# Altium PCB zulu_a7_fab_b.PcbDoc (part 2 of 5)
Units mm, origin at the board's own origin, x right, y up, seen from the top; angles counter-clockwise.
Board outline 69.85 x 25.4 mm, 6 copper layers (Top Layer, L2-GND, L3-SIG, L4-SIG, L5-VCC3V3, Bottom Layer), stack 1.65 mm thick; 203 components, 197 nets, 896 pads, 2025 vias.
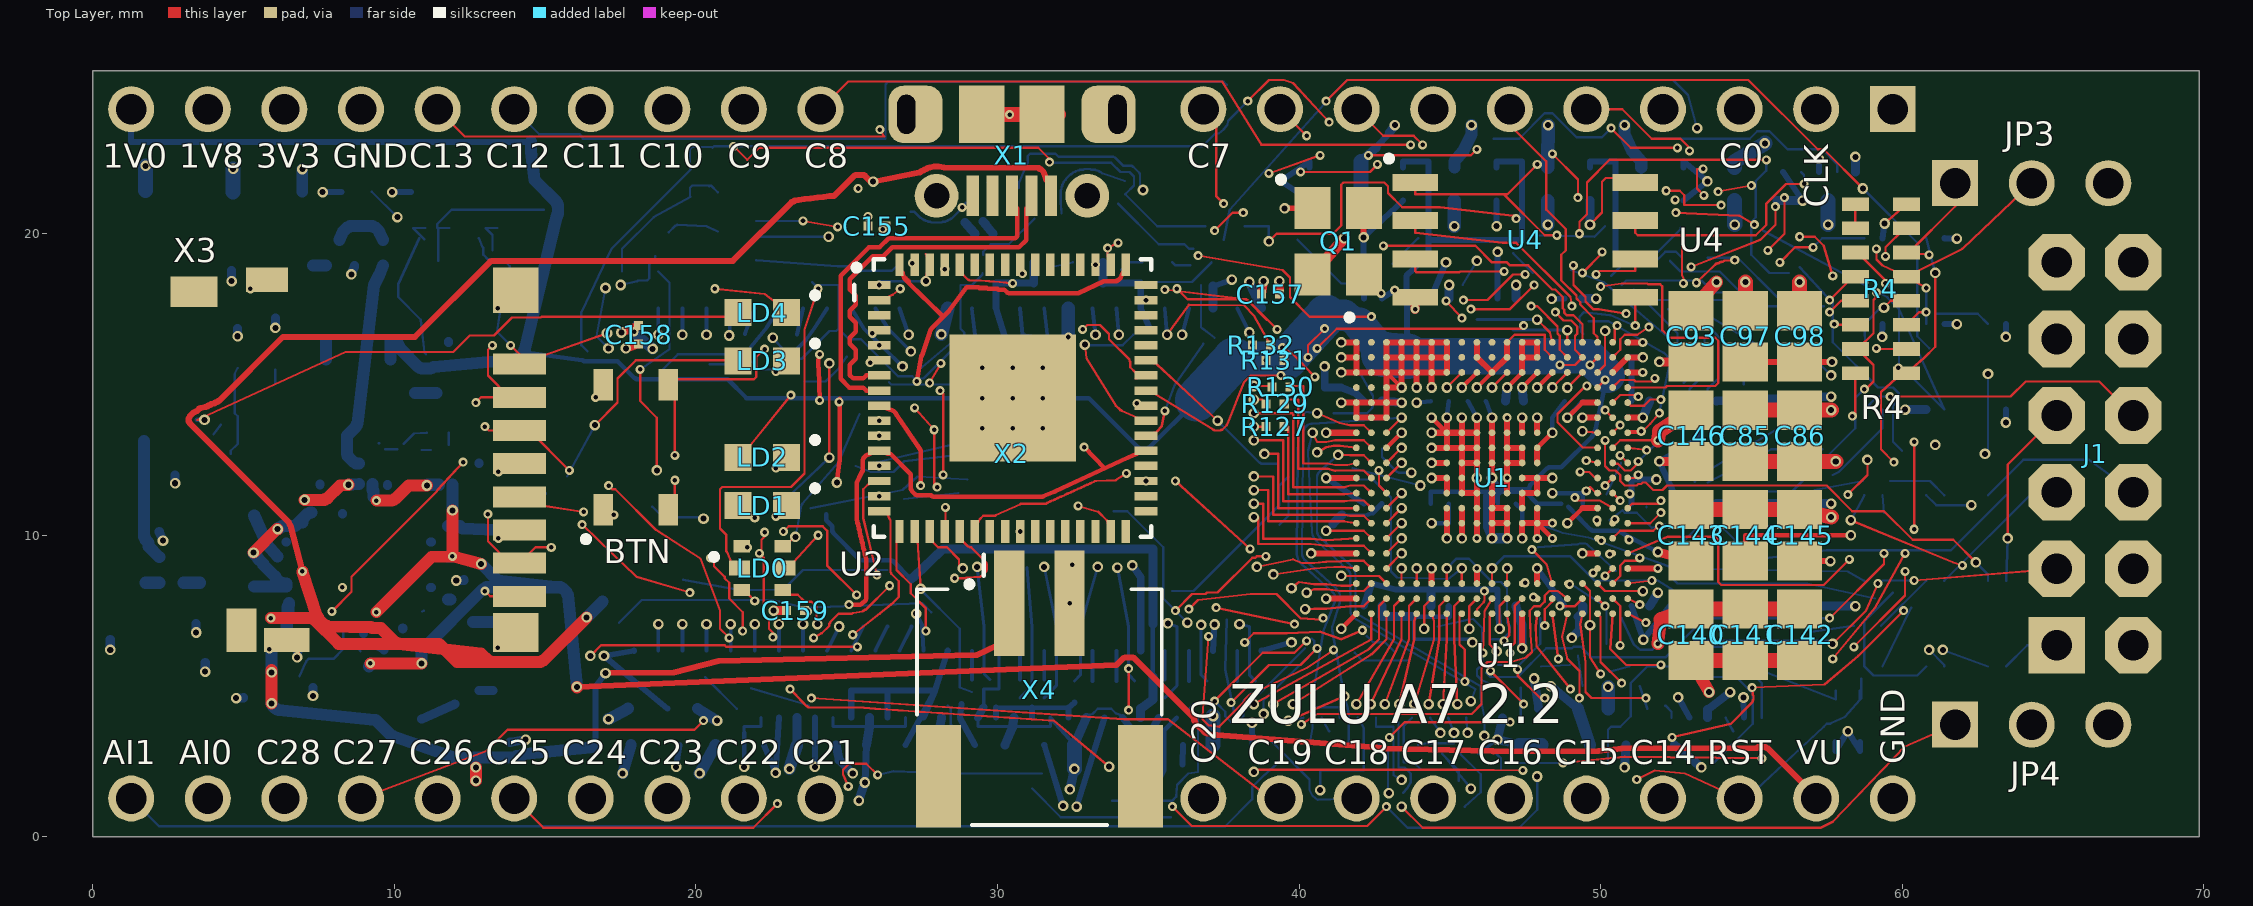
[diagram p0: Top Layer view]

## Part data (continued)
R1: library part RES2742, "Resistor 2-pack   Package of two resistors.", DeviceName=742, DeviceSetName=RES2, GateName_1=A, GateName_2=B, LibraryName=ctambe, MANF=CTS, MANF#=742C043472JP, NOTE="The two configuration pull-ups in one package: A on INIT_B (net FPGA-INIT#), B on PROGRAM_B (net RST#). Both commons are pads 3 and 4, side by side on one long side of the body, and both go to VCC3V3. CTS publishes ONE recommended land pattern for the whole 742 package family, so this footprint is the 742C083 pad cell already validated for R34 with two pads per side instead of four. 5 percent: the 742C043 has no 1 percent option either, and a configuration pull-up does not care; 63 mW per element against the 2.3 mW that 3.3 V across 4.7 k actually dissipates. Alternate on the identical land: Panasonic EXB-V4V472JV, same 1.60 x 1.60 mm concave body on 0.80 mm pitch. Do NOT substitute EXB-34V472JV -- same size, convex terminals, different land. R99, the third 4.7 k pull-up on this sheet, stays discrete: it sits on PROG#, the far side of the 100 ohm now in R4. TOLERANCE AGAINST UG470: Table 2-4 asks for a pull-up of 4.7 kohm OR LESS on both of these pins, and this is a 5 percent part, so its worst case is 4.935 k -- 5 percent outside the stated maximum. That is a wording problem rather than a physical one. The limit exists to hold the pin high against input leakage, and DS181 worst-case leakage of 15 uA across 4.935 k is 74 mV, against a VIH of 2.0 V. The discretes this replaces were 1 percent parts and were already outside the same limit, at 4.747 k. Strict compliance would mean 4.3 kohm +-5 percent (4.515 k worst case), but CTS does not stock a 432 code in the 742C043 family -- the stocked spread is 101, 220, 470, 471, 472, 473, 102, 103 and 104 -- so buying compliance here would cost availability, which is the thing that actually stops a board getting built. Dropping to the next stocked value, 1 k, would cost margin where it matters: it lifts the low level the bridge can assert on RST# through the 100 ohm from 0.10 V to 0.43 V.", SPEC="2 x 4.7K +-5% isolated array, 0606 concave 1.60 x 1.60 mm, 0.80 mm pitch, 63 mW per element", SymbolName_1=R1NV0, SymbolName_2=R1NV0
R2 R6 R7: library part R-WIDER0201, "RESISTOR, one element on the 0.4 in symbol   Same R1NV0 symbol the RES4 and RES8 arrays drew their elements with, so a part split out of an array keeps the exact symbol, pin span and position it had on the sheet and not one wire has to move. The 0.2 in R-US_SMALL symbol would have shifted both pins by 2.54 mm and stranded every net that touched them.", DeviceName=R0201, DeviceSetName=R-WIDE, GateName_1=G$1, LibraryName=rcl, MANF=Yageo, MANF#=RC0201FR-074K7L, SPEC="thick film +-1%, 1/20W, 0201", SymbolName_1=R1NV0
R4: library part RES8742, "Resistor 8-pack   Package of eight resistors, six used.", DeviceName=742, DeviceSetName=RES8, GateName_1=A, GateName_2=B, GateName_3=C, GateName_4=D, GateName_5=E, GateName_6=F, GateName_7=G, GateName_8=H, LibraryName=ctambe, MANF=CTS, MANF#=742C163101JP, NOTE="The six 100 ohm series resistors between the FT2232H and the FPGA in one package: A PROG#, B DONE, C TDI, D TDO, E TMS, F TCK, in the order they are drawn down the sheet. Pads 1-6 face the bridge and pads 16-11 face the FPGA, one long side of the body per end of the link. TWO ELEMENTS ARE SPARE (pads 7-10); they sit at the far end of the body, so the six used run contiguously from pad 1. Leave the spare pads unconnected. There is no purchasable 6-element part: CTS 753123101GP is a genuine 12-terminal, 6-isolated-element, 100 ohm array, but Digi-Key holds none, quotes 28 weeks at MOQ 1000 and $2.63 each, and its 12-SRT body is 8.76 x 2.03 mm, LARGER than this 8-element chip array. Same CTS 74x concave family as R34, so all three arrays on the board answer to one CTS land-pattern rule (0.45 x 0.80 mm pads, 0.80 mm pitch, 2.60 mm across). 5 percent like R34: the 742C163 has no 1 percent option, which series damping does not care about, and 63 mW per element is twenty times the worst case. Alternate if the layout needs the length back: Panasonic EXB-2HV101JV is the same 8 x 100 ohm isolated in 3.80 x 1.60 mm, but convex terminals on 0.50 mm pitch, so it needs its own land pattern. AT LAYOUT: all six lines now converge on one part -- put it between the bridge and the FPGA where the four JTAG lines already run together, and keep TCK, element F on pads 6/11, at the end of the body: its only live neighbour is TMS. SUPPLY CAVEATS, all read 2026-09-09. (1) CTS files the whole 74x series -- this part and R34's 742C083 with it -- under Legacy Products on its own site. Near-term risk is low: 25,352 stocked, MOQ 1, deep sibling stock. It is not a young family. (2) There is no drop-in second source on this land. The alternate above needs its own footprint, so this one package is a single point of failure where the six discretes it replaces had many interchangeable vendors; if that matters for the build, qualify a second 16-pad 0.80 mm concave array on the same land first. (3) Every stock and price figure here is Digi-Key alone -- Mouser, Arrow, TTI, Octopart and LCSC all refused automated reads that day -- so none of it has second-distributor corroboration. AND ONE LAYOUT POINT: the two spare elements are unplaced, so pads 7-10 carry no net. If the layout wants them as grounded metal beside TCK, that has to come back here as two more placed gates with both ends on GND; it cannot be done in the PCB alone.", SPEC="8 x 100 ohm +-5% isolated array, 2506 concave 6.40 x 1.60 mm, 0.80 mm pitch, 63 mW per element; six elements used, two spare", SymbolName_1=R1NV0, SymbolName_2=R1NV0, SymbolName_3=R1NV0, SymbolName_4=R1NV0, SymbolName_5=R1NV0, SymbolName_6=R1NV0, SymbolName_7=R1NV0, SymbolName_8=R1NV0
R5 R10 R11 R12 R13 R14 R15 R16 R17: library part R-US_R0201, "RESISTOR, American symbol", DeviceName=R0201, DeviceSetName=R-US_, GateName_1=G$1, LibraryName=rcl, MANF=Yageo, SPEC="thick film +-1%, 1/20W, 0201", SymbolName_1=R-US
  R5: MANF#=RC0201FR-075K1L, MOUSER#=301-5.1K-RC
  R10 R14: MANF#=RC0201FR-072K32L
  R11 R15: MANF#=RC0201FR-071KL
  R12 R16: MANF#=RC0201FR-07140RL
  R13 R17: MANF#=RC0201FR-07845RL
R18 R21 R80 R81 R82 R83 R84 R85 R86 R102 R103 R107 R108: library part R-US_SMALLR0402, "RESISTOR, American symbol, small 2-zigzag variant (sheet 2 only)", DeviceName=R0402, DeviceSetName=R-US_SMALL, GateName_1=G$1, LibraryName=rcl, MANF=Yageo, SymbolName_1=R-US_SMALL
  R18: MANF#=RC0402FR-0712KL, NOTE="Stays 0402 deliberately. Power is trivial (0.9 mW) and 1 percent is 1 percent at any size, but this is the FT2232's RREF -- it sets the USB transceiver bias current. There is no space pressure on this board any more, so there is nothing to gain against a part whose drift shows up as USB signal quality.", SPEC="thick film +-1%, 1/16W, 0402"
  R21: MANF#=RC0402FR-071KL, SPEC="thick film +-1%, 1/16W, 0402"
  R80 R82: MANF#=RC0402FR-0733RL, NOTE="RGB LED balance. The green and blue dice are 3.3 V-class parts on a 3.3 V rail, so the resistor never dominates their current -- that is structural and no resistor value fixes it. What the values CAN do is stop red swamping the other two. As built, and as Cmod A7 ships the same LED, 182/182/100 gave red 6.9 mA against green 1.9 and blue 1.5: red about four times either. At 330/33/33 it is red 3.8, green 2.9, blue 2.9. Worst case improves too, not just nominal -- green with a part 0.15 V high in Vf goes from 1.4 mA to 1.8. Lower resistors do make the current MORE sensitive in percentage terms, 77 percent of nominal retained at 100R against 61 at 33R, but the absolute floor is what you see and it rises. Currents read off the datasheet's own Vf/If curve at the working point, not off the 20 mA table.", SPEC="thick film +-1%, 1/16W, 0402"
  R81: MANF#=RC0402FR-07330RL, NOTE="RGB LED balance. The green and blue dice are 3.3 V-class parts on a 3.3 V rail, so the resistor never dominates their current -- that is structural and no resistor value fixes it. What the values CAN do is stop red swamping the other two. As built, and as Cmod A7 ships the same LED, 182/182/100 gave red 6.9 mA against green 1.9 and blue 1.5: red about four times either. At 330/33/33 it is red 3.8, green 2.9, blue 2.9. Worst case improves too, not just nominal -- green with a part 0.15 V high in Vf goes from 1.4 mA to 1.8. Lower resistors do make the current MORE sensitive in percentage terms, 77 percent of nominal retained at 100R against 61 at 33R, but the absolute floor is what you see and it rises. Currents read off the datasheet's own Vf/If curve at the working point, not off the 20 mA table.", SPEC="thick film +-1%, 1/16W, 0402"
  R83 R84: MANF#=RC0402FR-07330RL, SPEC="thick film +-1%, 1/16W, 0402"
  R85 R86: MANF#=RC0402FR-0710KL, SPEC="thick film +-1%, 1/16W, 0402"
  R102: MANF#=RC0402FR-074K12L, SPEC="thick film +-1% 0402 -- LTC3556 PROG: 1022 V / 4.12k = 248 mA charge current"
  R103: MANF#=RC0402FR-07576RL, SPEC="thick film +-1% 0402 -- LTC3556 CLPROG, 500 mA USB limit with I2C off (1x mode, hCLPROG 224): 1.188 V x 225 / 576 = 464 mA + 0.4 mA typ, ~425-489 mA over the datasheet spread; CLPROG pin 2.1 mA < 3 mA abs max"
  R107: MANF#=RC0402FR-07680RL, SPEC="thick film +-1% 0402 -- PGOODALL pull-up and LD3 current: (3.3 - 2.0) / 680 = 1.9 mA"
  R108: MANF#=RC0402FR-071KL, SPEC="thick film +-1% 0402 -- LD4 (CHRG) current: (3.7 - 2.0) / 1.0k = 1.7 mA"
R19 R20 R22 R23 R24 R25 R26 R27 R28 R29 R30 R31 R32 R33 R90 R91 R92 R93 R94 R96 R97 R98 R99 R101 R113 R114 R115 R116 R117 R118: library part R-US_SMALLR0201, "RESISTOR, American symbol, small 2-zigzag variant (sheet 2 only)", DeviceName=R0201, DeviceSetName=R-US_SMALL, GateName_1=G$1, LibraryName=rcl, MANF=Yageo, SymbolName_1=R-US_SMALL
  R19 R90 R91 R92 R93 R94 R96 R97 R98: MANF#=RC0201FR-0710KL, SPEC="thick film +-1%, 1/20W, 0201"
  R20 R22 R23: MANF#=RC0201FR-071KL, SPEC="thick film +-1%, 1/20W, 0201"
  R24 R25: MANF#=RC0201FR-0733RL, SPEC="thick film +-1%, 1/20W, 0201"
  R26 R27 R28 R29 R30 R31 R32 R33: MANF#=RC0201FR-07200RL, SPEC="thick film +-1%, 1/20W, 0201"
  R99: MANF#=RC0201FR-074K7L, SPEC="thick film +-1%, 1/20W, 0201"
  R101: MANF#=RC0201FR-072K21L, SPEC="thick film +-1%, 1/20W, 0201"
  R113: MANF#=RC0201FR-07150KL, SPEC="thick film +-1% 0201 -- Buck2 divider top: 0.8 V x (1 + 150k/120k) = 1.800 V"
  R114: MANF#=RC0201FR-07120KL, SPEC="thick film +-1% 0201 -- Buck2 divider bottom"
  R115: MANF#=RC0201FR-07324KL, SPEC="thick film +-1% 0201 -- buck-boost divider top / Type III R1 (sets the compensation; keep): 0.8 V x (1 + 324k/104k) = 3.29 V"
  R116: MANF#=RC0201FR-07102KL, SPEC="thick film +-1% 0201 -- buck-boost divider bottom (RFB, DC only): VCC3V3 = 0.8 V x (1 + 324k/102k) = 3.34 V (2026-11-11: 104k 0.1% ERA-1AEB1043C does not exist; ERA-1AEB 0201 stops at 10k)"
  R117: MANF#=RC0201FR-0715KL, SPEC="thick film +-1% 0201 -- Type III R2 (with C165, VC3 to FB3)"
  R118: MANF#=RC0201FR-07121KL, SPEC="thick film +-1% 0201 -- Type III R3 (with C166 across R115)"
R34: library part RES4742, "Resistor 4-pack   Package of four resistors.", DeviceName=742, DeviceSetName=RES4, DIGIKEY#=742C083???JPCT-ND, GateName_1=A, GateName_2=B, GateName_3=C, GateName_4=D, LibraryName=ctambe, MANF=CTS, MANF#=742C083472JP, MOUSER#=774-742C083???JP, NOTE="The microSD DAT0-3 pull-ups, all four elements used -- which is what an array is actually for. R1, R2 and R4 used 2, 3 and 6 of theirs in the EAGLE original and were split into discretes during the import; on 2026-09-09 R1 and R4 went back into arrays of their own (742C043472JP and 742C163101JP), so all three arrays on this board are CTS 74x concave parts sharing one land-pattern rule. R2 is still a discrete. 4.7k is the conventional value for SD data lines and it was already chosen; only the part number was missing. 5 percent is ample for a pull-up, so this is a J part where the discrete resistors on this board are F. CTS 742C is the family the footprint is named after. Confirm the suffix -- it encodes tolerance and packaging and is the easy thing to get wrong.", SPEC="4x4.7K isolated array 0603x4, 0.8 mm pitch; direct successor of the obsolete JTR", SymbolName_1=R1NV0, SymbolName_2=R1NV0, SymbolName_3=R1NV0, SymbolName_4=R1NV0
R35: library part R-US_R0402, "RESISTOR, American symbol", DeviceName=R0402, DeviceSetName=R-US_, GateName_1=G$1, LibraryName=rcl, MANF=Yageo, MANF#=RC0402FR-074K7L, SPEC="thick film +-1%, 1/16W, 0402", SymbolName_1=R-US
R119 R120 R121 R122 R123 R124 R125 R126 R127 R128 R129 R130 R131 R132 R133 R134: library part R-US_SMALLR0201, "RESISTOR, American symbol, small 2-zigzag variant", DeviceName=R0201, DeviceSetName=R-US_SMALL, GateName_1=G$1, LibraryName=rcl, MANF=Yageo, MANF#=RC0201FR-0722RL, NOTE="series R on the SDRAM data net; position is SI-critical, see Zulu_A7_no_pmod/Rev_2/docs/dq_series_resistors.md", SPEC="thick film +-1%, 1/20W, 0201", SymbolName_1=R-US_SMALL
U1: library part XC7A35T-CPG236-1CPG236C, "Xilinx Artix-7 XC7A35T-2CPG236I   Replacement for the Spartan-6 XC6SLX25-FT256. See design notes: SDRAM/microSD/GPIO ball assignments verified against Digilent Cmod A7-35T (same device+package); config/JTAG/power ball assignments are functionally correct placeholders pending verification against the official Xilinx pinout file.", POWER=POWER, BANK216="BANK 216", DeviceName=-2CPG236I, DeviceSetName=XC7A35T-CPG236, GATE=A0, GateName_1=PWR, GateName_2=GND, GateName_3=BANK216, GateName_4=PART_VALUE, GateName_5=SDRAM_A0, GateName_6=SDRAM_A1, GateName_7=SDRAM_A2, GateName_8=SDRAM_A3, GateName_9=SDRAM_A4, GateName_10=SDRAM_A5, GateName_11=SDRAM_A6, GateName_12=SDRAM_A7, GateName_13=SDRAM_A8, GateName_14=SDRAM_A9, GateName_15=SDRAM_A10, GateName_16=SDRAM_A11, GateName_17=SDRAM_A12, GateName_18=SDRAM_BA0, GateName_19=SDRAM_BA1, GateName_20=SDRAM_CAS#, GateName_21=SDRAM_RAS#, GateName_22=SDRAM_WE#, GateName_23=SDRAM_CS#, GateName_24=SDRAM_CKE, GateName_25=SDRAM_CLK, GateName_26=SDRAM_LDQM, GateName_27=SDRAM_UDQM, GateName_28=SDRAM_DQ0, GateName_29=SDRAM_DQ1, GateName_30=SDRAM_DQ2, GateName_31=SDRAM_DQ3, GateName_32=SDRAM_DQ4, GateName_33=SDRAM_DQ5, GateName_34=SDRAM_DQ6, GateName_35=SDRAM_DQ7, GateName_36=SDRAM_DQ8, GateName_37=SDRAM_DQ9, GateName_38=SDRAM_DQ10, GateName_39=SDRAM_DQ11, GateName_40=SDRAM_DQ12, GateName_41=SDRAM_DQ13, GateName_42=SDRAM_DQ14, GateName_43=SDRAM_DQ15, GateName_44=SPI_SPI_CCLK, GateName_45=SPI_D00_MOSI, GateName_46=SPI_D01_DIN, GateName_47=SPI_FCS_B, GateName_48=SD_DAT3, GateName_49=SD_DAT2, GateName_50=SD_DAT1, GateName_51=CHAN0, GateName_52=CHAN1, GateName_53=CHAN2, GateName_54=CHAN3, GateName_55=CHAN4, GateName_56=CHAN5, GateName_57=CHAN6, GateName_58=CHAN7, GateName_59=CHAN8, GateName_60=CHAN9, GateName_61=CHAN10, GateName_62=CHAN11, GateName_63=IO_W7, GateName_64=CHAN12, GateName_65=CHAN13, GateName_66=CHAN14, GateName_67=CHAN15, GateName_68=CHAN16, GateName_69=CHAN17, GateName_70=CHAN18, GateName_71=CHAN19, GateName_72=CHAN20, GateName_73=CHAN21, GateName_74=CHAN22, GateName_75=CHAN23, GateName_76=CHAN24, GateName_77=CHAN25, GateName_78=CHAN26, GateName_79=CHAN27, GateName_80=UART_CTS, GateName_81=CHAN-CLK, GateName_82=XADC_P, GateName_83=USB_PWREN, GateName_84=XADC_N, GateName_85=CLK12M, GateName_86=UART_TXD, GateName_87=UART_RXD, GateName_88=PROGRAM_B, GateName_89=INIT_B, GateName_90=DONE, GateName_91=TCK, GateName_92=TMS, GateName_93=TDI, GateName_94=TDO, GateName_95=M0, GateName_96=M1, GateName_97=M2, GateName_98=CFGBVS, GateName_99=PUDC_B, GateName_100=MGTPRXP0, GateName_101=MGTPRXN0, GateName_102=MGTPRXP1, GateName_103=MGTPRXN1, GateName_104=GNDADC, GateName_105=VCCADC, GateName_106=VP, GateName_107=VN, GateName_108=VREFP, GateName_109=VREFN, GateName_110=DXP, GateName_111=DXN, GateName_112=MGTPTXP0, GateName_113=MGTPTXN0, GateName_114=MGTPTXP1, GateName_115=MGTREFCLK0P, GateName_116=MGTREFCLK0N, GateName_117=MGTREFCLK1P, GateName_118=MGTREFCLK1N, GateName_119=MGTPTXN1, GateName_120=CHAN28, GateName_121=LED2, GateName_122=LED0_R, GateName_123=IO_A14, GateName_124=IO_A15, GateName_125=IO_A16, GateName_126=LED1, GateName_127=BTN, GateName_128=SD_DAT0, GateName_129=LED0_G, GateName_130=IO_W19, GateName_131=LED0_B, GateName_132=IO_C15, GateName_133=IO_B15, GateName_134=SD_CLK, GateName_135=UART_RTS, GateName_136=IO_N2, GateName_137=SD_CMD, GateName_138=UART_DTR, GateName_139=SPI_D03, GateName_140=SPI_D02, GateName_141=XADC1_P, GateName_142=XADC1_N, GND=GND, LibraryName=ctambe, MANF=AMD/Xilinx, MANF#=XC7A35T-2CPG236I, PART=U1, SymbolName_1=A7_PWR, SymbolName_2=A7_GND, SymbolName_3=A7_BANK216, SymbolName_4=PV_GATE, SymbolName_5=PIN_GATE_IO, SymbolName_6=PIN_GATE_IO, SymbolName_7=PIN_GATE_IO, SymbolName_8=PIN_GATE_IO, SymbolName_9=PIN_GATE_IO, SymbolName_10=PIN_GATE_IO, SymbolName_11=PIN_GATE_IO, SymbolName_12=PIN_GATE_IO, SymbolName_13=PIN_GATE_IO, SymbolName_14=PIN_GATE_IO, SymbolName_15=PIN_GATE_IO, SymbolName_16=PIN_GATE_IO, SymbolName_17=PIN_GATE_IO, SymbolName_18=PIN_GATE_IO, SymbolName_19=PIN_GATE_IO, SymbolName_20=PIN_GATE_IO, SymbolName_21=PIN_GATE_IO, SymbolName_22=PIN_GATE_IO, SymbolName_23=PIN_GATE_IO, SymbolName_24=PIN_GATE_IO, SymbolName_25=PIN_GATE_IO, SymbolName_26=PIN_GATE_IO, SymbolName_27=PIN_GATE_IO, SymbolName_28=PIN_GATE_IO, SymbolName_29=PIN_GATE_IO, SymbolName_30=PIN_GATE_IO, SymbolName_31=PIN_GATE_IO, SymbolName_32=PIN_GATE_IO, SymbolName_33=PIN_GATE_IO, SymbolName_34=PIN_GATE_IO, SymbolName_35=PIN_GATE_IO, SymbolName_36=PIN_GATE_IO, SymbolName_37=PIN_GATE_IO, SymbolName_38=PIN_GATE_IO, SymbolName_39=PIN_GATE_IO, SymbolName_40=PIN_GATE_IO, SymbolName_41=PIN_GATE_IO, SymbolName_42=PIN_GATE_IO, SymbolName_43=PIN_GATE_IO, SymbolName_44=PIN_GATE_IO, SymbolName_45=PIN_GATE_IO, SymbolName_46=PIN_GATE_IO, SymbolName_47=PIN_GATE_IO, SymbolName_48=PIN_GATE_IO, SymbolName_49=PIN_GATE_IO, SymbolName_50=PIN_GATE_IO, SymbolName_51=PIN_GATE_IO, SymbolName_52=PIN_GATE_IO, SymbolName_53=PIN_GATE_IO, SymbolName_54=PIN_GATE_IO, SymbolName_55=PIN_GATE_IO, SymbolName_56=PIN_GATE_IO, SymbolName_57=PIN_GATE_IO, SymbolName_58=PIN_GATE_IO, SymbolName_59=PIN_GATE_IO, SymbolName_60=PIN_GATE_IO, SymbolName_61=PIN_GATE_IO, SymbolName_62=PIN_GATE_IO, SymbolName_63=PIN_GATE_IO, SymbolName_64=PIN_GATE_IO, SymbolName_65=PIN_GATE_IO, SymbolName_66=PIN_GATE_IO, SymbolName_67=PIN_GATE_IO, SymbolName_68=PIN_GATE_IO, SymbolName_69=PIN_GATE_IO, SymbolName_70=PIN_GATE_IO, SymbolName_71=PIN_GATE_IO, SymbolName_72=PIN_GATE_IO, SymbolName_73=PIN_GATE_IO, SymbolName_74=PIN_GATE_IO, SymbolName_75=PIN_GATE_IO, SymbolName_76=PIN_GATE_IO, SymbolName_77=PIN_GATE_IO, SymbolName_78=PIN_GATE_IO, SymbolName_79=PIN_GATE_IO, SymbolName_80=PIN_GATE_OUT, SymbolName_81=PIN_GATE_IO, SymbolName_82=PIN_GATE_IN, SymbolName_83=PIN_GATE_IN, SymbolName_84=PIN_GATE_IN, SymbolName_85=PIN_GATE_IN, SymbolName_86=PIN_GATE_IO, SymbolName_87=PIN_GATE_IO, SymbolName_88=PIN_GATE_IN, SymbolName_89=PIN_GATE_IN, SymbolName_90=PIN_GATE_IN, SymbolName_91=PIN_GATE_IN, SymbolName_92=PIN_GATE_IN, SymbolName_93=PIN_GATE_IN, SymbolName_94=PIN_GATE_IN, SymbolName_95=PIN_GATE_IN, SymbolName_96=PIN_GATE_IN, SymbolName_97=PIN_GATE_IN, SymbolName_98=PIN_GATE_IN, SymbolName_99=PIN_GATE_IN, SymbolName_100=PIN_GATE_IN, SymbolName_101=PIN_GATE_IN, SymbolName_102=PIN_GATE_IN, SymbolName_103=PIN_GATE_IN, SymbolName_104=PIN_GATE_IN, SymbolName_105=PIN_GATE_IN, SymbolName_106=PIN_GATE_IN, SymbolName_107=PIN_GATE_IN, SymbolName_108=PIN_GATE_IN, SymbolName_109=PIN_GATE_IN, SymbolName_110=PIN_GATE_IN, SymbolName_111=PIN_GATE_IN, SymbolName_112=PIN_GATE_IN, SymbolName_113=PIN_GATE_IN, SymbolName_114=PIN_GATE_IN, SymbolName_115=PIN_GATE_IN, SymbolName_116=PIN_GATE_IN, SymbolName_117=PIN_GATE_IN, SymbolName_118=PIN_GATE_IN, SymbolName_119=PIN_GATE_IN, SymbolName_120=PIN_GATE_IN, SymbolName_121=PIN_GATE_IN, SymbolName_122=PIN_GATE_IN, SymbolName_123=PIN_GATE_IN, SymbolName_124=PIN_GATE_IN, SymbolName_125=PIN_GATE_IN, SymbolName_126=PIN_GATE_IN, SymbolName_127=PIN_GATE_IN, SymbolName_128=PIN_GATE_IO, SymbolName_129=PIN_GATE_IN, SymbolName_130=PIN_GATE_IN, SymbolName_131=PIN_GATE_IN, SymbolName_132=PIN_GATE_IN, SymbolName_133=PIN_GATE_IN, SymbolName_134=PIN_GATE_IO, SymbolName_135=PIN_GATE_IN, SymbolName_136=PIN_GATE_IN, SymbolName_137=PIN_GATE_IO, SymbolName_138=PIN_GATE_IN, SymbolName_139=PIN_GATE_IO, SymbolName_140=PIN_GATE_IO, SymbolName_141=PIN_GATE_IN, SymbolName_142=PIN_GATE_IN
U2: library part FT2232HQ-QFN64, "FTDI FT2232HQ Dual USB-UART/MPSSE Bridge, QFN-64. Channel A = MPSSE JTAG to the FPGA (ADBUS0-3 = TCK/TDI/TDO/TMS, ADBUS4/5 = PROG#/DONE). Channel B = UART (BDBUS0-4 = TXD/RXD/RTS#/CTS#/DTR#). Pins 1-64 match FT2232HL; EP is grounded.", DeviceName=-QFN64, DeviceSetName=FT2232HQ, FT2232HQ=FT2232HQ, GateName_1=G$1, LibraryName=ctambe, MANF=FTDI, MANF#=FT2232HQ-REEL, NOTE="FT2232HQ-REEL. Use FTDI-authorized distribution because counterfeit FTDI devices exist. Pins 1-64 match FT2232HL. EP is a separate schematic pin tied to GND as required by DS_FT2232H section 8.1. Footprint FT2232HQ-QFN64 uses 0.75 x 0.28 mm perimeter lands and a 4.20 mm exposed-pad land.", SPEC="USB 2.0 Hi-Speed dual-channel UART/FIFO/MPSSE bridge, QFN-64 9 x 9 mm body, 0.5 mm pitch, 4.35 mm package exposed pad on a 4.20 mm PCB land; same die and pin numbering as FT2232HL; channel A MPSSE JTAG + PROG#/DONE, channel B UART; 12 MHz CMOS oscillator into OSCI, internal 1.8 V regulator, 93LC46B EEPROM, REF 12 k", SymbolName_1=FT2232HQ-BOX
U3: library part SDRAM-X16-ALLIANCE-512M, "SDR SDRAM, x16, 54-pin TSOP-II   The 54-pin TSOP-II x16 SDR pinout is identical for 256Mb and 512Mb: both use row A0-A12 with banks BA0/BA1, and pin 40 is NC on both. They differ only in the column address width -- A0-A8 (512 columns) at 256Mb, A0-A9 (1024 columns) at 512Mb -- which is a memory-controller setting, not a wiring change.", DeviceName=-ALLIANCE-512M, DeviceSetName=SDRAM-X16, GATE=VDD@3, GateName_1=PART_VALUE, GateName_2=VDD@3, GateName_3=DQ0, GateName_4=VDDQ@3, GateName_5=DQ1, GateName_6=DQ2, GateName_7=VSSQ@3, GateName_8=DQ3, GateName_9=DQ4, GateName_10=VDDQ@2, GateName_11=DQ5, GateName_12=DQ6, GateName_13=VSSQ@2, GateName_14=DQ7, GateName_15=VDD@2, GateName_16=LDQM, GateName_17=WE#, GateName_18=CAS#, GateName_19=RAS#, GateName_20=CS#, GateName_21=BA0, GateName_22=BA1, GateName_23=A10, GateName_24=A0, GateName_25=A1, GateName_26=A2, GateName_27=A3, GateName_28=VDD@1, GateName_29=VSS@1, GateName_30=A4, GateName_31=A5, GateName_32=A6, GateName_33=A7, GateName_34=A8, GateName_35=A9, GateName_36=A11, GateName_37=A12, GateName_38=CKE, GateName_39=CLK, GateName_40=UDQM, GateName_41=NC, GateName_42=VSS@2, GateName_43=DQ8, GateName_44=VDDQ@1, GateName_45=DQ9, GateName_46=DQ10, GateName_47=VSSQ@4, GateName_48=DQ11, GateName_49=DQ12, GateName_50=VDDQ@4, GateName_51=DQ13, GateName_52=DQ14, GateName_53=VSSQ@1, GateName_54=DQ15, GateName_55=VSS@3, LibraryName=ctambe, MANF="Alliance Memory", MANF#=AS4C32M16SB-7TCN, NOTE="512Mbit (32M x 16) = 64MB. Pin-for-pin and dimensionally identical to the 256Mb AS4C16M16SA-6TIN it replaces: all 54 pins and every TSOP-II dimension were checked against both datasheets, and pin 40 is NC on both. ONE DIFFERENCE, AND IT IS NOT A PIN -- the column address is A0-A9 (1024 columns) instead of A0-A8 (512). The memory controller must be set to 10 column bits or it reaches only half the array. Row A0-A12, banks BA0/BA1 and refresh (8192 cycles/64ms) are unchanged. IDD1 rises 60mA to 120mA on the 600mA VCC3V3 buck (LTC3569 SW3). 2026-09-08: AS4C32M16SB-6TIN replaced by AS4C32M16SB-7TCN (same B die, 54-TSOP II 400 mil and pinout, datasheet Rev 1.4 Table 2): -7 speed bin, 143 MHz max at CL3 (tCK 7 ns, tAC 5.4 ns), tRCD/tRP 21 ns, tRC/tRFC 63 ns, tRRD/tMRD/tWR 14 ns, tCH/tCL 2.5 ns; 100 MHz at CL2 for every grade. Commercial TA 0..70 C, matching the -1C FPGA. IDD1 max 110 mA (was 120). AS4C32M16SB-7TIN (industrial) is the timing-identical alternate; the -6TIN only if the controller is clocked above 143 MHz.", PART=U3, SymbolName_1=PART_VALUE-SDRAM-X16, SymbolName_2=PL-SDRAM-X16, SymbolName_3=PL-SDRAM-X16, SymbolName_4=PL-SDRAM-X16, SymbolName_5=PL-SDRAM-X16, SymbolName_6=PL-SDRAM-X16, SymbolName_7=PL-SDRAM-X16, SymbolName_8=PL-SDRAM-X16, SymbolName_9=PL-SDRAM-X16, SymbolName_10=PL-SDRAM-X16, SymbolName_11=PL-SDRAM-X16, SymbolName_12=PL-SDRAM-X16, SymbolName_13=PL-SDRAM-X16, SymbolName_14=PL-SDRAM-X16, SymbolName_15=PL-SDRAM-X16, SymbolName_16=PL-SDRAM-X16, SymbolName_17=PL-SDRAM-X16, SymbolName_18=PL-SDRAM-X16, SymbolName_19=PL-SDRAM-X16, SymbolName_20=PL-SDRAM-X16, SymbolName_21=PL-SDRAM-X16, SymbolName_22=PL-SDRAM-X16, SymbolName_23=PL-SDRAM-X16, SymbolName_24=PL-SDRAM-X16, SymbolName_25=PL-SDRAM-X16, SymbolName_26=PL-SDRAM-X16, SymbolName_27=PL-SDRAM-X16, SymbolName_28=PL-SDRAM-X16, SymbolName_29=PL-SDRAM-X16, SymbolName_30=PL-SDRAM-X16, SymbolName_31=PL-SDRAM-X16, SymbolName_32=PL-SDRAM-X16, SymbolName_33=PL-SDRAM-X16, SymbolName_34=PL-SDRAM-X16, SymbolName_35=PL-SDRAM-X16, SymbolName_36=PL-SDRAM-X16, SymbolName_37=PL-SDRAM-X16, SymbolName_38=PL-SDRAM-X16, SymbolName_39=PL-SDRAM-X16, SymbolName_40=PL-SDRAM-X16, SymbolName_41=PL-SDRAM-X16, SymbolName_42=PL-SDRAM-X16, SymbolName_43=PL-SDRAM-X16, SymbolName_44=PL-SDRAM-X16, SymbolName_45=PL-SDRAM-X16, SymbolName_46=PL-SDRAM-X16, SymbolName_47=PL-SDRAM-X16, SymbolName_48=PL-SDRAM-X16, SymbolName_49=PL-SDRAM-X16, SymbolName_50=PL-SDRAM-X16, SymbolName_51=PL-SDRAM-X16, SymbolName_52=PL-SDRAM-X16, SymbolName_53=PL-SDRAM-X16, SymbolName_54=PL-SDRAM-X16, SymbolName_55=PL-SDRAM-X16
U4: library part SPI_FLASH-SOIC_150_208, "SPI Flash", DeviceName=-SOIC_150_208, DeviceSetName=SPI_FLASH, DIGIKEY#=W25Q128JVSIQ-ND, GATE=CS#, GateName_1=PART, GateName_2=CS#, GateName_3=DO, GateName_4=WP#, GateName_5=GND, GateName_6=DI, GateName_7=CLK, GateName_8=HOLD#, GateName_9=VCC, LibraryName=ctambe, MANF=Winbond, MANF#=W25Q128JVSIQ, NOTE="128Mbit quad SPI, SOIC-8 208mil. The XC7A35T bitstream is 17,536,096 bits, so the previous W25Q80BV (8Mbit) could not boot the part at all. 128Mbit leaves ~14MB for user data above the bitstream.", PART=U4, SymbolName_1=PV_GATE, SymbolName_2=PIN_GATE_IN, SymbolName_3=PIN_GATE_OUT, SymbolName_4=PIN_GATE_IN, SymbolName_5=PIN_GATE_IN, SymbolName_6=PIN_GATE_IN, SymbolName_7=PIN_GATE_IN, SymbolName_8=PIN_GATE_IN, SymbolName_9=PIN_GATE_IN
U7: library part SC189-SOT23-5, "1.5A 2.5MHz synchronous buck, fixed output (Semtech SC189)", PartName=SC189A, MANF=Semtech, MANF#=SC189ASKTRT
U8: library part LTC3556-UFD28, "USB power manager: PowerPath + Li-ion charger + dual 400 mA buck + 1 A buck-boost (Analog Devices LTC3556, UFD QFN-28 4 x 5 mm)", PartName=LTC3556, MANF="Analog Devices", MANF#=LTC3556EUFD#PBF
U10: library part EEPROM-93LC46B-I/MS, "Microchip 93LC46BT-I/MS (MSOP-8; was the SOIC-8 -I/SN until 2026-11-20), FTDI EEPROM (USB VID/PID/descriptors)   64 x 16 = 1 Kbit. DS_FT2232H p27: \"The EEPROM should be a 16 bit wide configuration such as a Microchip 93LC46B or equivalent capable of a 1 Mbit/s clock rate at VCC = +3.00 V to 3.6 V.\" The B suffix is the fixed x16 organisation, so pins 6 and 7 are both no-connect; only the selectable C variant puts ORG on pin 6.", 93LC46B=93LC46B, DeviceName=-I/MS, DeviceSetName=EEPROM-93LC46B, GateName_1=G$1, LibraryName=ctambe, MANF=Microchip, MANF#=93LC46BT-I/MS, SymbolName_1=EEPROM-93LC46B-BOX
X1: library part MINI-USB-105017-0001, "MINI USB Connector   Source: http://www.hirose.co.jp/cataloge_hp/e24000019.pdf", DeviceName=105017-0001, DeviceSetName=MINI-USB-, GateName_1=G$1, LibraryName=ctambe, MANF=Molex, MANF#=105017-0001, SymbolName_1=MINI-USB
X2: "Zulu A7 Board Connector", DeviceSetName=ZULU-CONN, GATE=CHAN-CLK, GateName_1=CHAN-CLK, GateName_2=CHAN0, GateName_3=CHAN1, GateName_4=CHAN2, GateName_5=CHAN3, GateName_6=CHAN4, GateName_7=CHAN5, GateName_8=CHAN6, GateName_9=CHAN7, GateName_10=CHAN8, GateName_11=CHAN9, GateName_12=CHAN10, GateName_13=CHAN11, GateName_14=+1.8V, GateName_15=+3.3V, GateName_16=GND, GateName_17=+1.0V, GateName_18=RST#, GateName_19=CHAN14, GateName_20=CHAN15, GateName_21=CHAN16, GateName_22=CHAN17, GateName_23=CHAN18, GateName_24=CHAN19, GateName_25=CHAN20, GateName_26=CHAN21, GateName_27=CHAN22, GateName_28=CHAN23, GateName_29=CHAN24, GateName_30=CHAN25, GateName_31=CHAN26, GateName_32=CHAN27, GateName_33=ANALOG-IO0, GateName_34=ANALOG-IO1, GateName_35=CHAN28, GateName_36=G$1, GateName_37=GND2, GateName_38=CHAN12, GateName_39=CHAN13, GateName_40=GND4, GateName_41=VU, LibraryName=ctambe, MANF=Sullins, MANF#="4x PRPC010SAAN-RC", NOTE="Pin field ZULU-DIP37 (Rev 2, 2026-11-11): 40 pins of 1.016 mm on 2.54 mm pitch, two rows 22.86 mm (0.900 in) apart, numbered 1-40 straight through and skipping both landings. The rows are mirror images: top row pins 1-10 (x 59.69..36.83) = GND, CHAN-CLK, CHAN0..CHAN7, FOUR positions for the micro-USB X1 (34.29..26.67, X1 centred on x 30.48), pins 11-20 (24.13..1.27) = CHAN8..CHAN13, GND, +3.3V, +1.8V, +1.0V; bottom row pins 21-30 (59.69..36.83) = GND, VU, RST#, CHAN14..CHAN20, FOUR positions for the LiPo header X4 at the SAME four x values (X4 centred on x 30.48, top side, opposite X1), pins 31-40 (24.13..1.27) = CHAN21..CHAN28, ANALOG-IO0, ANALOG-IO1. Each landing is 12.70 mm between the neighbouring pin centres (36.83 and 24.13). Rev 2 change: pins 10 (CHAN7) and 30 (CHAN20) moved from x 26.67 to 36.83 and X1/X4 moved 2.54 mm west, so the strips are four identical 1x10. Pin numbers and nets are unchanged. Three grounds (1, 17, 21); 3.3 V for the header is pin 18 alone; pin 22 VU is the LTC3556 PowerPath output (VOUT). Sullins PRPC strips fit the holes (0.64 mm square pins, Sullins recommends 1.02 mm). Alternate: any 2.54 mm 1x40 breakaway strip cut to 10 + 10 twice.", PART=X2, SPEC="four 0.1 in male breakaway header strips, 0.64 mm square gold-flash pins, 2.54 mm pitch, through-hole, mounted from the underside, one part number, four per board: PRPC010SAAN-RC 1x10 for pins 1-10, 11-20, 21-30 and 31-40 (Rev 2, 2026-11-11: both landings moved one pin west so each row splits 10 + 10)", SymbolName_1=PIN_GATE_IO, SymbolName_2=PIN_GATE_IN, SymbolName_3=PIN_GATE_IO, SymbolName_4=PIN_GATE_IO, SymbolName_5=PIN_GATE_IO, SymbolName_6=PIN_GATE_IO, SymbolName_7=PIN_GATE_IO, SymbolName_8=PIN_GATE_IO, SymbolName_9=PIN_GATE_IN, SymbolName_10=PIN_GATE_IO, SymbolName_11=PIN_GATE_IO, SymbolName_12=PIN_GATE_IN, SymbolName_13=PIN_GATE_IO, SymbolName_14=PIN_GATE_IO, SymbolName_15=PIN_GATE_IO, SymbolName_16=PIN_GATE_IO, SymbolName_17=PIN_GATE_IO, SymbolName_18=PIN_GATE_IO, SymbolName_19=PIN_GATE_IO, SymbolName_20=PIN_GATE_IO, SymbolName_21=PIN_GATE_IN, SymbolName_22=PIN_GATE_IO, SymbolName_23=PIN_GATE_IO, SymbolName_24=PIN_GATE_IO, SymbolName_25=PIN_GATE_IO, SymbolName_26=PIN_GATE_IN, SymbolName_27=PIN_GATE_IO, SymbolName_28=PIN_GATE_IO, SymbolName_29=PIN_GATE_IN, SymbolName_30=PIN_GATE_IO, SymbolName_31=PIN_GATE_IO, SymbolName_32=PIN_GATE_IO, SymbolName_33=PIN_GATE_IO, SymbolName_34=PIN_GATE_IO, SymbolName_35=PIN_GATE_IO, SymbolName_36=PV_GATE, SymbolName_37=PIN_GATE_IO, SymbolName_38=PIN_GATE_IO, SymbolName_39=PIN_GATE_IO, SymbolName_40=PIN_GATE_IO, SymbolName_41=PIN_GATE_IO
X3: library part MICROSD_CONDM3D-SF, "microSD socket, push-pull, Hirose DM3D-SF", DeviceName=DM3D-SF, DeviceSetName=MICROSD_CON, GateName_1=G$1, HRS#=609-0025-8, LibraryName=ctambe, MANF=Hirose, MANF#=DM3D-SF, MOUSER#=MOUSER#, SPEC="microSD push-pull (no eject), top mount, 0.5 A; 8 contacts + 4 shell pads G1-G4 + card-detect switch A/B (open without card); DM3 catalog p9", SymbolName_1=MICROSD_CON
X4: library part JST-S2B-PH-SM4-TB, "JST PH 2.0 mm 2-pin side-entry SMT header, LiPo battery input", DeviceName=S2B-SM4-TB, DeviceSetName=JST-PH-2, GateName_1=G$1, LibraryName=ctambe, MANF=JST, MANF#=S2B-PH-SM4-TB(LF)(SN), NOTE="S2B-PH-SM4-TB(LF)(SN), top-side SMT side-entry header between X2 pins 30 and 31; the opening faces the south board edge, so the cable plugs in parallel to the board. There is no universal JST-PH LiPo polarity standard: verify pack positive goes to pin 1 before plugging in.", SPEC="JST PH 2.0 mm, 2 circuits, side-entry SMT header, 2 A, 100 V, -25..85 C, mates with PHR-2; pin 1 = battery +, pin 2 = GND", SymbolName_1=CONN-2
U$2: CC=CC, DeviceSetName=CC_CC, GateName_1=G$1, LibraryName=ctambe, SymbolName_1=CC_CC
U$3: BY=BY, DeviceSetName=CC_BY, GateName_1=G$1, LibraryName=ctambe, SymbolName_1=CC_BY
U$4: DeviceSetName=CC_SA, GateName_1=G$1, LibraryName=ctambe, SA=SA, SymbolName_1=CC_SA
U$5: C=C, DeviceSetName=CC_COPYRIGHT, GateName_1=G$1, LibraryName=ctambe, SymbolName_1=CC_COPYRIGHT

## Via types
v1: diameter 0.27, hole 0.15, L3-SIG to L4-SIG, tented both sides, 403 vias
v2: diameter 0.3, hole 0.15, Top Layer to L2-GND, tented both sides, 344 vias
v3: diameter 0.3, hole 0.15, L5-VCC3V3 to Bottom Layer, tented both sides, 330 vias
v4: diameter 0.35, hole 0.2, Top Layer to Bottom Layer, tented both sides, 329 vias
v5: diameter 0.3, hole 0.15, L4-SIG to L5-VCC3V3, tented both sides, 312 vias
v6: diameter 0.3, hole 0.15, L2-GND to L3-SIG, tented both sides, 307 vias

## Nets (pads, with @x,y where several pads share a name; then routed paths per layer and width w, separated by ;. In a path a pad name is that pad's centre, name@x,y a point inside that pad or via, vN(x,y) a via of type N, cw(c..) or ccw(c..) an arc to the next point about the centre after c; other vN are vias at no path point)
A0: U1.U2 U3.23 | length 24.1
  Top Layer w0.076: v4(40.25,8.1) 40.5,8.21 40.9,8.21 41.35,8.15 41.688,8.15 42.15,8.15 U1.U2@42.4,8.4
  L3-SIG w0.125: v4(21.15,7.05) 21.85,8.425 21.85,8.45 21.875,8.45 27.175,9.75 35.825,9.75 35.9,9.725 37.725,7.9 39.975,7.9 v4(40.25,8.1)
  Bottom Layer w0.125: U3.23@21.15,6.17 v4(21.15,7.05)
A1: U1.T3 U3.24 | length 26.6
  Top Layer w0.076: U1.T3@42.9,8.9 v4(43.4,9.4)
  L3-SIG w0.125: v4(20.35,7.05) 21.05,8.45 21.75,8.675 27.15,10 35.85,10 36,9.95 37.625,8.35 39.25,8.35 40.275,8.95 v4(43.4,9.4)
  Bottom Layer w0.125: U3.24@20.35,6.17 v4(20.35,7.05)
A2: U1.T2 U3.25 | length 25.4
  Top Layer w0.076: v4(38.6,8.95) 39.8,9.2 40.1,9.08 40.5,9.08 40.9,9.12 41.4,9.14 41.688,9.15 42.15,9.15 U1.T2@42.4,8.9
  L4-SIG w0.125: v4(19.55,7.05) 20.25,8.45 29.05,10.5 36.125,10.425 v4(38.6,8.95)
  Bottom Layer w0.125: U3.25@19.55,6.17 v4(19.55,7.05)
A3: U1.T1 U3.26 | length 25.6
  Top Layer w0.076: v4(39.15,8.7) 40.5,8.9 40.9,8.93 41.4,8.96 41.7,8.92 U1.T1@41.9,8.9
  L3-SIG w0.125: v4(18.75,7.05) 19.45,8.45 27.125,10.25 35.875,10.25 36.1,10.175 38.4,8.6 38.7,8.6 v4(39.15,8.7)
  Bottom Layer w0.125: U3.26@18.75,6.17 v4(18.75,7.05)
A4: U1.R3 U3.29 | length 28.6
  Top Layer w0.076: U1.R3@42.9,9.4 v4(43.4,9.9)
  L4-SIG w0.125: v4(18.75,16.65) 19.425,15.3 21.775,13.675 22.325,13.525 36.175,10.725 36.875,10.325 37.675,9.825 39.875,8.85 40,8.775 40.675,8.75 v4(43.4,9.9)
  Bottom Layer w0.125: v4(18.75,16.65) U3.29@18.75,17.53
A5: U1.R2 U3.30 | length 26.5
  Top Layer w0.076: v4(38.5,10.6) 38.646,10.6 38.646,9.71 40.4,9.71 40.9,9.65 41.688,9.65 42.15,9.65 U1.R2@42.4,9.4
  L3-SIG w0.125: v4(19.55,16.65) 20.225,15.3 22.05,13.675 23.125,13.175 v4(38.5,10.6)
  Bottom Layer w0.125: v4(19.55,16.65) U3.30@19.55,17.53
A6: U1.P3 U3.31 | length 27.3
  Top Layer w0.076: U1.P3@42.9,9.9 v4(43.4,10.4)
  L4-SIG w0.125: v4(20.35,16.65) 21.05,15.3 21.875,13.9 22.85,13.65 36.175,11.025 36.275,10.975 36.675,10.75 38.075,9.9 40.025,9.25 40.225,9.05 40.5,9.05 v4(43.4,10.4)
  Bottom Layer w0.125: v4(20.35,16.65) U3.31@20.35,17.53
A7: U1.P1 U3.32 | length 25.1
  Top Layer w0.076: v4(38.5,11.05) 38.813,11.05 38.813,9.88 40.4,9.88 40.9,9.83 41.4,9.87 U1.P1@41.9,9.9
  L3-SIG w0.125: v4@21.1,16.65 22.15,13.9 23.225,13.4 v4(38.5,11.05)
  Bottom Layer w0.1: v4(21.1,16.625) v4@21.1,16.65
  Bottom Layer w0.125: v4@21.1,16.65 U3.32@21.15,17.53
A8: U1.N3 U3.33 | length 26.2
  Top Layer w0.076: U1.N3@42.9,10.4 v4(43.4,10.9)
  L4-SIG w0.125: v5(21.625,16.675) 21.5,16.55 21.475,16.15 22.95,13.875 30.425,12.625 36.275,11.3 38.3,10.075 41,9.8 v4(43.4,10.9)
  Bottom Layer w0.125: v5(21.625,16.675) U3.33@21.95,17.53
  other v3: 21.625,16.675
A9: U1.N2 U3.34 | length 25.2
  Top Layer w0.076: v4(38.5,11.95) 39.146,11.95 39.146,10.68 40.9,10.68 41.5,10.68 41.688,10.65 42.15,10.65 U1.N2@42.4,10.4
  L3-SIG w0.125: v5(21.825,16.25) 23.225,13.75 23.325,13.625 v4(38.5,11.95)
  Bottom Layer w0.125: v5(21.825,16.25) 22.35,16.9 U3.34@22.75,17.53
  other v1: 21.825,16.25
  other v3: 21.825,16.25
A10: U1.U3 U3.22 | length 23.9
  Top Layer w0.076: v4(41.4,8.65) 42.65,8.65 U1.U3@42.9,8.4
  L4-SIG w0.125: v4(21.95,7.05) 22.65,8.45 23.35,8.675 27,9.7 30.9,10.25 36.1,10.175 36.325,10 38.075,8.4 39.25,8.35 39.3,8.375 39.55,8.6 39.85,8.6 40.025,8.475 40.925,8.475 v4(41.4,8.65)
  Bottom Layer w0.125: U3.22@21.95,6.17 v4(21.95,7.05)
A11: U1.N1 U3.35 | length 22.8
  Top Layer w0.076: v4(38.5,11.5) 38.98,11.5 38.98,10.46 40.9,10.46 41.5,10.46 U1.N1@41.9,10.4
  L4-SIG w0.125: v5(23.35,16.65) 23.725,16.3 24.225,13.9 v4(38.5,11.5)
  Bottom Layer w0.125: v5(23.35,16.65) U3.35@23.55,17.53
  other v3: 23.35,16.65
A12: U1.M3 U3.36 | length 24
  Top Layer w0.076: U1.M3@42.9,10.9 v4(43.4,11.4)
  L3-SIG w0.1: 32.375,13.875 36.425,13.275 36.475,13.275 36.575,13.175 36.675,13.175 36.7,13.15 38.6,12.3 38.65,12.275 38.675,12.25 38.7,12.25
  L3-SIG w0.125: v5(23.35,16.175) 25.875,13.875 32.375,13.875 ; 38.7,12.25 39.55,11.4 v4(43.4,11.4)
  Bottom Layer w0.125: v5(23.35,16.175) 23.65,16.475 23.95,16.9 U3.36@24.35,17.53
  other v1: 23.35,16.175
  other v3: 23.35,16.175
AIN15_N: C36.1 R13.1 U1.G2 | length 15.4
  Top Layer w0.076: v4(40.6,14.05) 41.35,13.72 41.688,13.65 42.15,13.65 U1.G2@42.4,13.4
  Bottom Layer w0.076: C36.1@40.35,3.05 40.45,3.6 40.45,4.3 ; v4(40.6,14.05) 40.2,14.1 40.007,13.558 39.994,13.523 39.98,13.45 39.979,13.413 39.961,12.768 39.961,12.762 39.961,12.756 39.929,9.404 39.929,9.365 39.941,9.286 39.967,9.211 40.005,9.141 40.054,9.078 40.083,9.052 41.104,8.124 41.123,8.107 41.155,8.066 41.18,8.02 41.196,7.97 41.204,7.918 41.203,7.866 41.192,7.815 41.183,7.791 40.8,6.8 40.45,4.6 40.45,4.3 ; R13.1@41.35,3.95 41.35,4.3 40.45,4.3
AIN15_P: C36.2 R12.1 U1.G3 | length 17.6
  Top Layer w0.076: v4(39.65,3.85) v4(41.5,4.66) ; U1.G3@42.9,13.4 v4(43.4,13.9)
  Bottom Layer w0.076: v4(39.65,3.85) R12.1@40.15,3.95 ; C36.2@41.65,3.05 41.65,4.05 41.62,4.26 v4(41.5,4.66) 41.102,6.846 41.097,6.87 41.096,6.918 41.103,6.967 41.11,6.99 41.35,7.76 41.361,7.797 41.371,7.872 41.37,7.949 41.356,8.024 41.33,8.096 41.292,8.163 41.245,8.223 41.217,8.248 40.196,9.176 40.177,9.193 40.146,9.233 40.121,9.278 40.105,9.327 40.097,9.377 40.097,9.403 40.129,12.755 40.129,12.759 40.129,12.763 40.147,13.408 40.147,13.433 40.157,13.482 40.174,13.529 40.199,13.572 40.231,13.611 40.268,13.644 40.31,13.67 40.356,13.69 40.405,13.701 40.43,13.703 v4(43.4,13.9)
AIN16_N: C37.1 R17.1 U1.J2 | length 19.7
  Top Layer w0.076: v4(41.3,12.665) 41.688,12.65 42.15,12.65 U1.J2@42.4,12.4
  L4-SIG w0.076: v4(42.98,1.45) 43,2.3 45,2.7 v4(46.15,3.35)
  Bottom Layer w0.076: v4(41.3,12.665) 40.698,12.126 40.679,12.109 40.647,12.069 40.622,12.024 40.605,11.976 40.597,11.926 40.597,11.9 40.597,10.15 40.597,10.125 40.605,10.075 40.622,10.027 40.646,9.982 40.677,9.942 40.696,9.925 41.717,8.998 41.746,8.972 41.794,8.91 41.832,8.841 41.858,8.767 41.871,8.69 41.871,8.65 41.872,7.5 41.872,7.489 41.876,7.467 41.883,7.446 41.894,7.427 41.908,7.409 41.926,7.395 41.935,7.389 46.016,5 46.02,4.6 R17.1@46.15,3.95 v4(46.15,3.35) ; C37.1@42.65,3.05 42.95,2.9 42.95,1.6 v4(42.98,1.45)
AIN16_P: C37.2 R16.1 U1.H2 | length 17.3
  Top Layer w0.076: v4(40.45,13.4) 40.6,13.09 40.9,13.09 41.2,13.15 41.688,13.15 42.15,13.15 U1.H2@42.4,12.9
  L4-SIG w0.076: v4(45.14,3.45) v4(45.7,4.5)
  Bottom Layer w0.076: v4(40.45,13.4) 40.306,12.824 40.3,12.802 40.296,12.757 40.297,12.735 40.43,10.126 40.432,10.089 40.447,10.017 40.473,9.948 40.51,9.884 40.556,9.826 40.584,9.802 41.604,8.875 41.623,8.858 41.654,8.818 41.678,8.773 41.695,8.726 41.703,8.676 41.703,8.65 41.705,7.5 41.705,7.474 41.714,7.424 41.731,7.375 41.757,7.331 41.79,7.292 41.829,7.258 41.851,7.245 45.85,4.9 v4(45.7,4.5) ; C37.2@43.95,3.05 44.25,3.1 45.14,3.1 v4(45.14,3.45) R16.1@44.95,3.95
ANALOG-IO0: R10.2 X2.39 | length 45.2
  L3-SIG w0.076: v1(34.9,1) 35.6,0.3 44.8,0.3 v1(45.5,1)
  L4-SIG w0.076: X2.39@3.81,1.27 4.78,0.3 34.2,0.3 v1(34.9,1)
  Bottom Layer w0.076: R10.2@45.35,2.75 46.025,2.075 46.025,1.475 v1(45.5,1)
  other v3: 45.5,1
  other v5: 45.5,1
ANALOG-IO1: R14.2 X2.40 | length 57.1
  L3-SIG w0.076: v1(39.35,2.5) 40.85,4 v1(46.05,4) ; v1(43.45,1.45) 43.6,1.6 43.7,1.8 44.1,2.2 44.8,2.2 45.2,1.8 45.3,1.55 45.6,1.25 45.8,1.25 46,1.45 46,1.55 46.75,2.3 47.15,2.35 47.3,2.55 v1(47.15,3)
  L4-SIG w0.076: v1(46.05,4) 46.25,4 46.9,3.35 v1(47.15,3)
  Bottom Layer w0.076: X2.40@1.27,1.27 2.19,0.35 37.55,0.35 38.45,1.25 38.45,1.65 38.8,2 v1(39.35,2.5) ; R14.2@43.15,3.95 43.298,3.802 43.298,2.3 43.5,2.3 43.705,2.095 43.705,1.8 43.6,1.62 v1(43.45,1.45)
  other v3: 43.45,1.45 39.35,2.5
  other v5: 43.45,1.45 39.35,2.5
BS0: U1.V2 U3.20 | length 21.8
  Top Layer w0.076: v4(40.2,7.55) 40.5,7.56 40.9,7.56 41.688,7.65 42.15,7.65 U1.V2@42.4,7.9
  L3-SIG w0.125: v4(23.55,7.05) 24.25,8.45 27.2,9.5 35.8,9.5 37.9,7.4 39.875,7.4 v4(40.2,7.55)
  Bottom Layer w0.125: U3.20@23.55,6.17 v4(23.55,7.05)
BS1: U1.U1 U3.21 | length 22.1
  Top Layer w0.076: v4(39.75,8.25) 40,8.45 40.5,8.38 40.9,8.38 41.4,8.33 41.7,8.33 U1.U1@41.9,8.4
  L4-SIG w0.125: v4(22.75,7.05) 23.45,8.45 27.2,9.5 31.15,10 36,9.95 36.45,9.575 38.2,7.975 39.525,7.95 v4(39.75,8.25)
  Bottom Layer w0.125: U3.21@22.75,6.17 v4(22.75,7.05)
BTN: R85.2 U1.N19 | length 29.9
  Top Layer w0.076: v4(39,19.75) 39.25,20 41.125,20 41.4,20.275 41.4,21.625 41.475,21.7 42.825,21.7 42.95,21.575 42.95,21.35 43.425,20.875 44.675,20.875 47.1,20.6 v2(47.2,20.5) ; U1.N19@50.9,10.4 51.65,10.4 v2(52,10.75)
  L3-SIG w0.076: v1(51.6,20.6) 51.6,20.45 52.45,19.6 52.45,17.95 53.25,17.15 v1(53.25,15.3) ; v2(52,10.75) 52.15,10.75 53.45,12.05 53.85,12.05 v1(54.6,12.8)
  L4-SIG w0.076: v2(47.2,20.5) 47.35,20.65 50.3,20.65 50.35,20.6 v1(51.6,20.6) ; v1(53.25,15.3) 53.4,15.3 54.6,14.1 v1(54.6,12.8)
  Bottom Layer w0.076: R85.2@38.2,20.25 39,20.25 v4(39,19.75)
  other v1: 47.2,20.5
  other v6: 52,10.75 47.2,20.5
CAS#: U1.W3 U3.17 | length 19.9
  Top Layer w0.076: v4(39.8,4.4) 42.4,6.05 42.9,6.55 U1.W3@42.9,7.4
  L4-SIG w0.125: v5(26.35,6.975) 26.35,6.725 27.575,5.5 39.25,4.75 v4(39.8,4.4)
  Bottom Layer w0.125: U3.17@25.95,6.17 v5(26.35,6.975)
  other v3: 26.35,6.975